# EAGLE board Report3 (EAGLE 9.7.0)

Size 108.38 x 87.56 mm. Coordinates in mm from the lower left corner, seen from the top.
Outline: 0,0 108.38,0 108.38,87.56 0,87.56 0,0
Copper layers (1*16): Top 0.035mm / dielectric 1.5mm / Bottom 0.035mm
Design rules "default": minimum track width 6mil, minimum drill 0.35mm, track to track 6mil, track to pad 6mil, pad to pad 6mil, via to via 6mil, smd to smd 6mil, copper to edge 40mil, drill to drill 6mil, minimum pad ring 10mil, minimum via ring 8mil, stop-mask expansion 4mil, vias tented up to drill 0mil, thermal gap 10mil

## Footprints (pad centres in the part's own frame; a part is rotated, then mirrored left to right if it is on the bottom)
RESAD1016W63L850D250B = drill 0.83 pad 1.43: 1 -5.08,0; 2 5.08,0

## Placement (x,y rotation side)
R1  1k  [RESAD1016W63L850D250B]  13.05,11.41 0 top
R2  1k  [RESAD1016W63L850D250B]  8.97,81.23 0 top
R3  1k  [RESAD1016W63L850D250B]  13.05,6.33 0 top
R4  1k  [RESAD1016W63L850D250B]  99.41,11.57 0 top
R5  1k  [RESAD1016W63L850D250B]  99.41,6.49 0 top

## Library data of the parts
R1-R5 = Tinkercad

## Nets
R1_1: R1.1 R3.1
R1_2: R1.2 R3.2
R4_1: R4.1 R4.2 R5.1 R5.2

## Tracks (layer width: path | path; a pad name or v marks a point on that pad's centre or on a via)
R1_1  (1 unrouted)
R1_2  (1 unrouted)
R4_1  (3 unrouted)